# Altium PCB elc.pcb.PcbDoc
Units mm, origin at the board's own origin, x right, y up, seen from the top; angles counter-clockwise.
Board outline 40 x 50 mm, 2 copper layers (Top Layer, Bottom Layer); 16 components, 13 nets, 51 pads, 0 vias.
Unrouted connection lines stored in the file: 5.
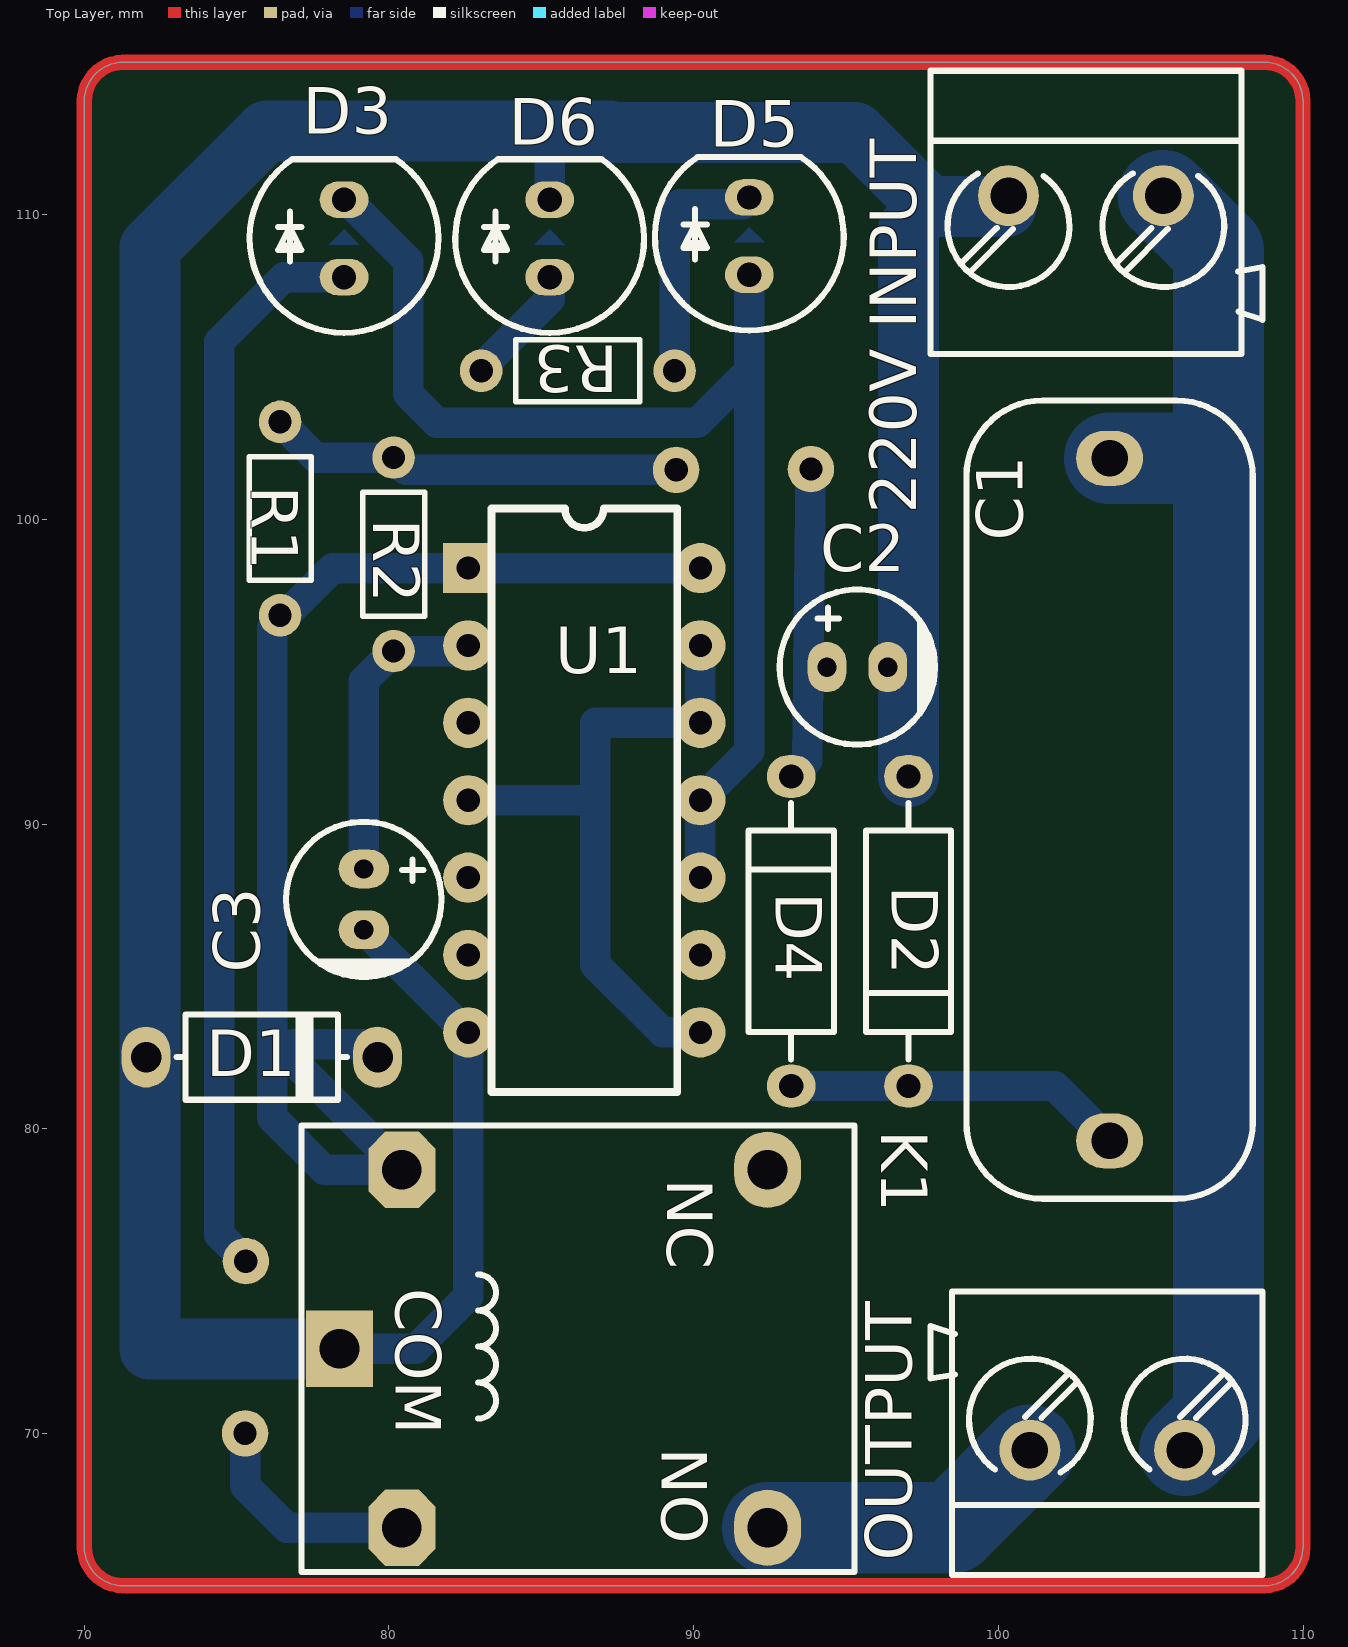
[diagram p0: Top Layer view]
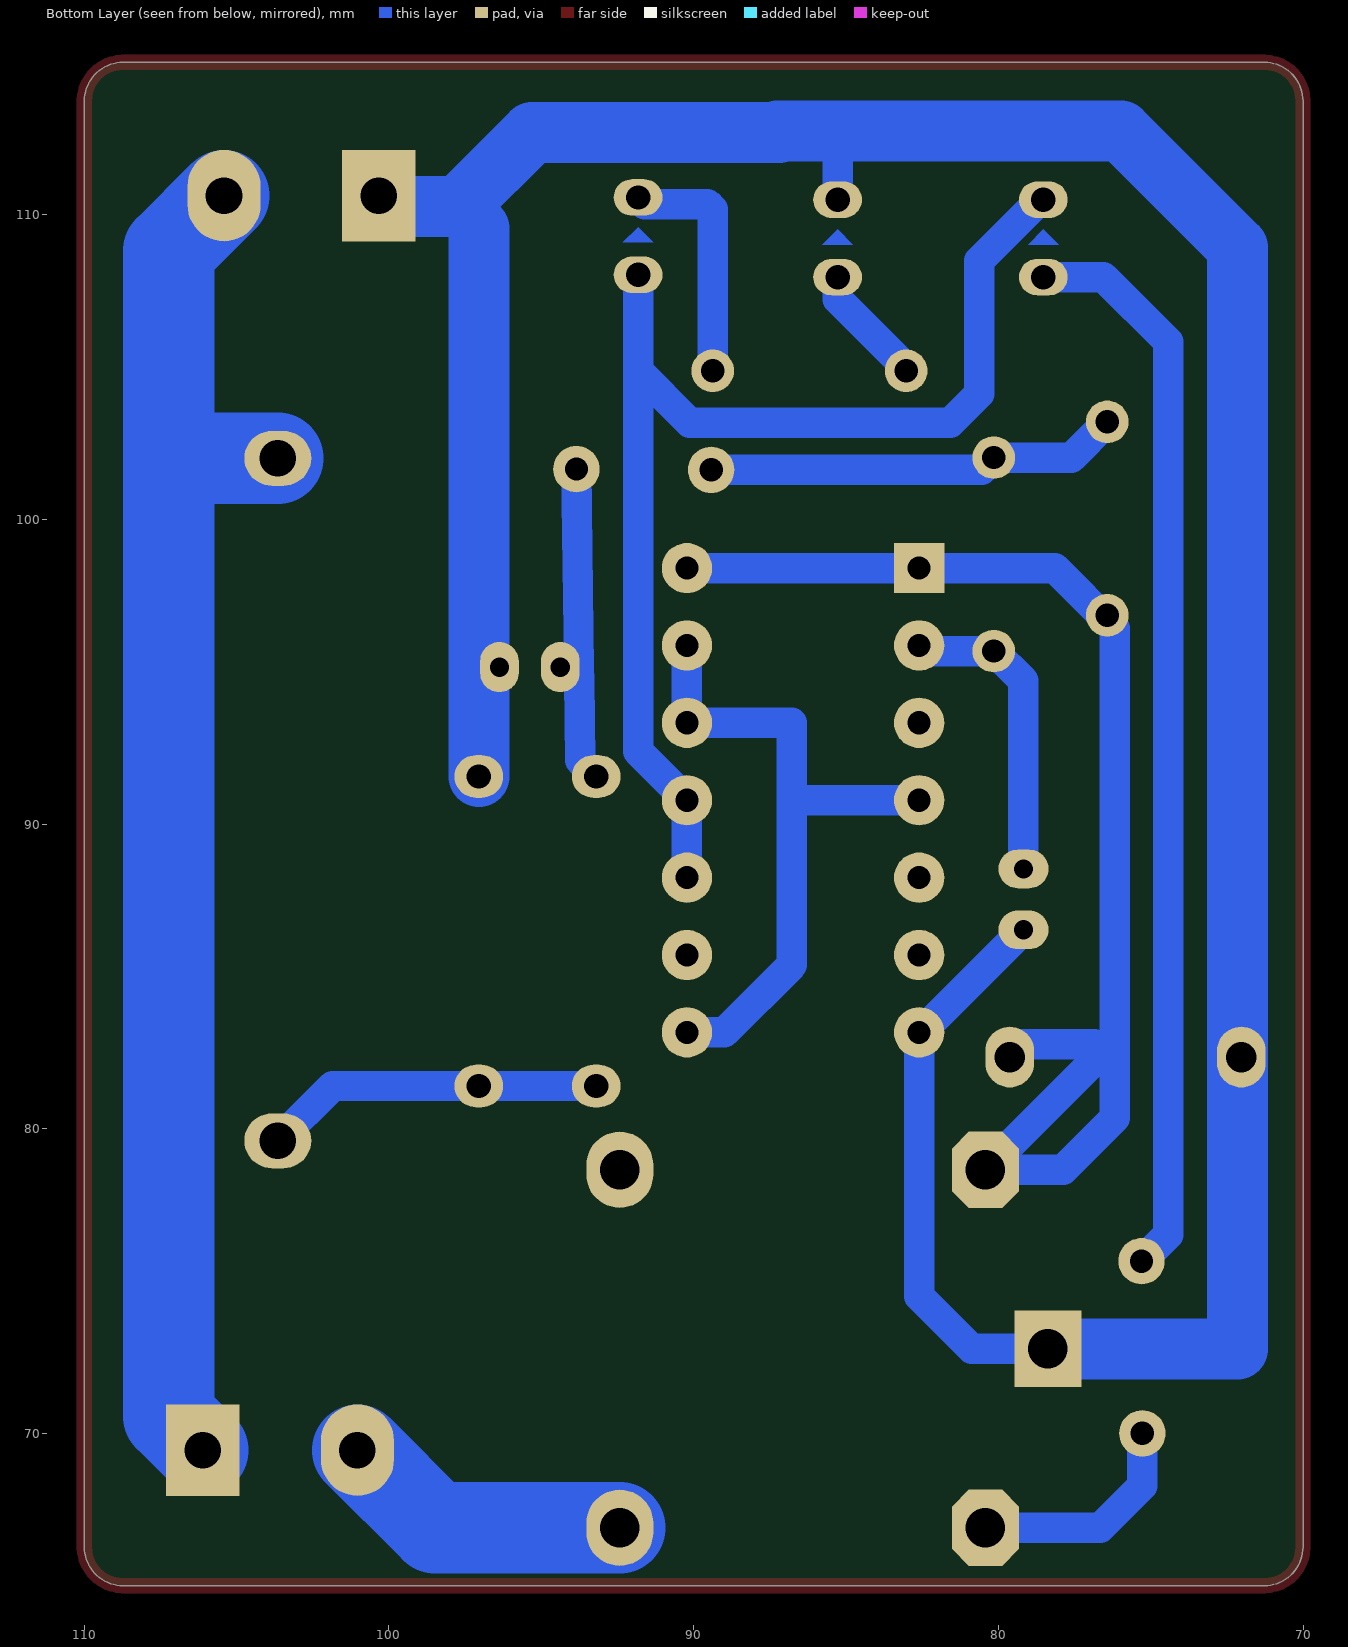
[diagram p1: Bottom Layer view, seen from below]
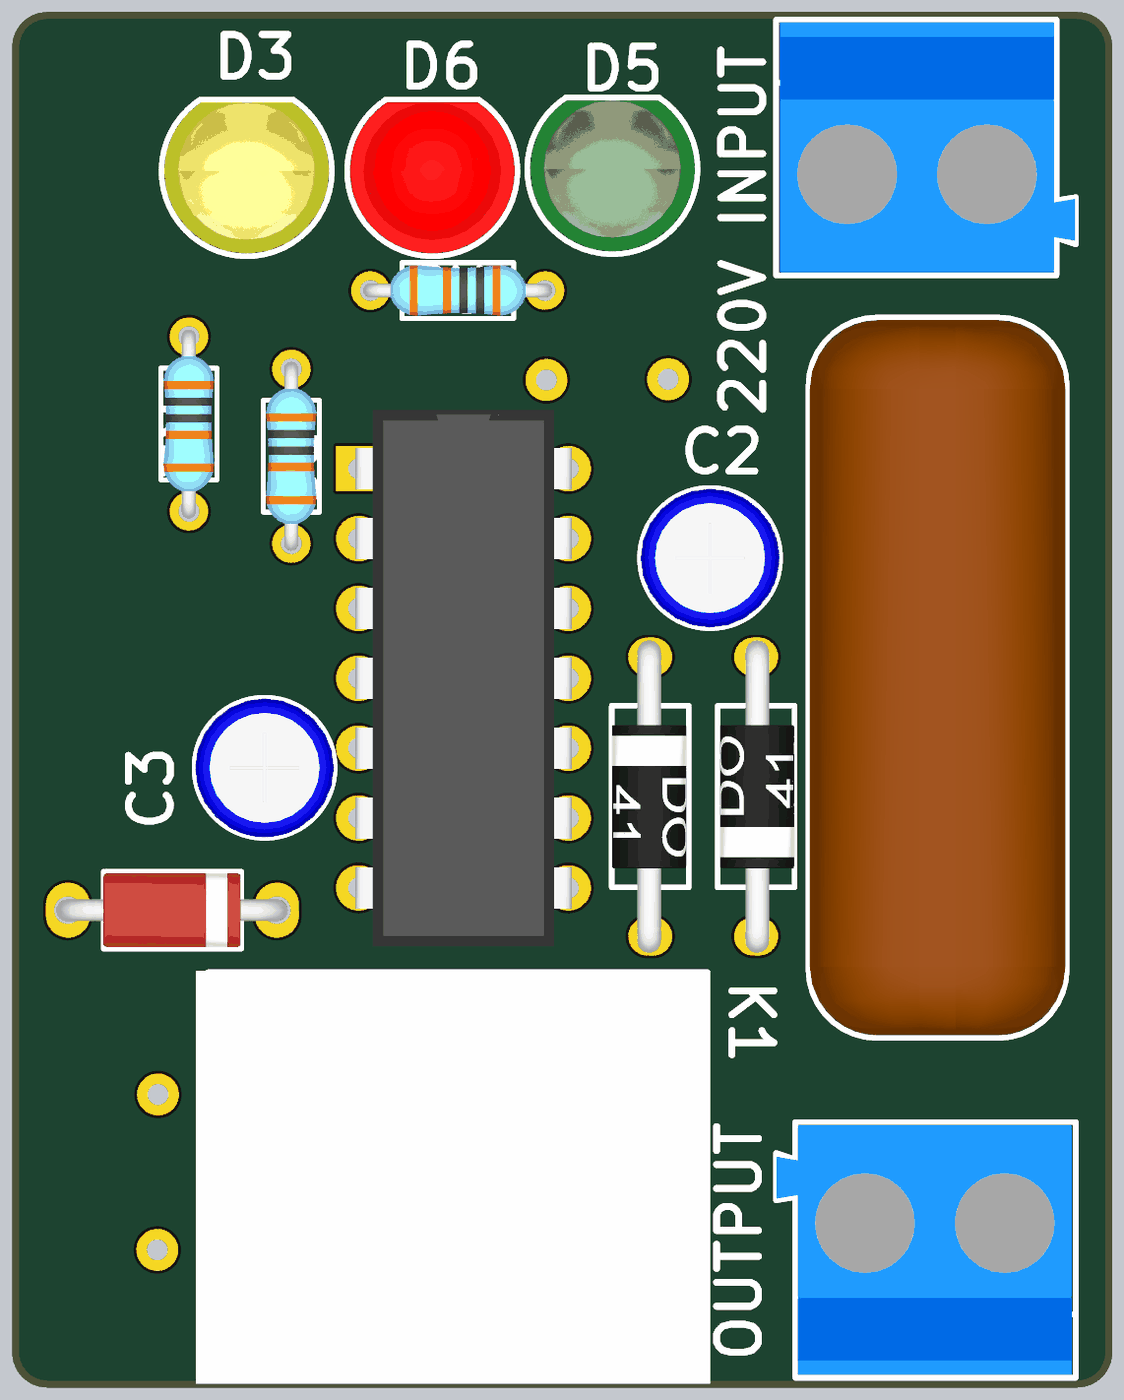
[diagram p2: 3D render of the assembled board from above, using the file's embedded part models]

## Layer stack, top to bottom
Top Solder: solder mask 0.0102, Solder Resist, Dk 3.5
Top Layer: signal copper 0.0356
Dielectric 1: dielectric 0.32, FR-4, Dk 4.8
Bottom Layer: signal copper 0.0356
Bottom Solder: solder mask 0.0102, Solder Resist, Dk 3.5

## Board outline
70,66.27 ccw(c71.27,66.27) 71.27,65 108.73,65 ccw(c108.73,66.27) 110,66.27 110,113.73 ccw(c108.73,113.73) 108.73,115 71.27,115 ccw(c71.27,113.73) 70,113.73

## Design rules (kind name [scope] priority, off if disabled: settings)
Clearance [All] p1: gap=0.254 ignorepadtopadclearanceinfootprint=FALSE except(0: Arc-Hole Track-Hole SMDPad-Hole THPad-Hole Via-Hole Fill-Hole Poly-Hole Region-Hole Text-Hole)
PolygonConnect [All] p1: connectstyle=Relief reliefconductorwidth=0.254 reliefentries=4 polygonreliefangle="90 Angle" airgapwidth=0.254
RoutingVias [All] p1: holewidth=0.711 width=1.27 viastyle="Through Hole" minholewidth=0.711 minwidth=1.27 maxholewidth=0.711 maxwidth=1.27
SolderMaskExpansion [All] p1: expansion=0.102
Width [All] p1: maxlimit=3 minlimit=1 preferedwidth=2
30 further rules are at their usual default settings.

## Components (designator, comment, footprint, x,y, rotation, side; value= is the part's Value field where it differs from the comment)
"220V INPUT" "CONN_TB2" TBB_2 102.875,110.625 r0 top
C1 "680nF" C_PLY_26X9 103.65,90.8 r270 top
C2 "100uF" "cap 01" 95.375,95.15 r180 top
C3 "100uF" "cap 01" 79.175,87.525 r90 top
D1 "ZENER16V" D_AX03_1W 75.825,82.35 r0 top
D2 "1N4007" D_AX04_DO41 97.05,86.48 r270 top
D3 "LED" LED5MM_YLO 78.525,109.22 r90 top
D4 "1N4007" D_AX04_DO41 93.2,86.48 r90 top
D5 "LED" LED5MM_GRN 91.825,109.295 r90 top
D6 "LED" LED5MM_RED 85.275,109.22 r90 top
K1 "Relay" "Relay 18.85x15.35x15.70" 85.4,72.775 r270 top
OUTPUT "CONN_TB2" TBB_2 103.575,69.45 r180 top
R1 "56R" Res-(1/4) 76.425,100.025 r270 top
R2 "3M3" Res-(1/4) 80.15,98.85 r270 top
R3 "3M3" Res-(1/4) 86.2,104.875 r180 top
U1 "CD4011BE" DIP14 86.41,90.78 r0 top

## Footprints (in the part's own frame and the unit in brackets; to place one, negate y for a bottom-side part, rotate by r counter-clockwise, add the part's x,y. Pads: shape width x height; smd on the part's side, far side on the other; paste and mask are expansions set on the pad)
C_PLY_26X9 [mm] "CAP, POLYESTER, 26.0X9.3mm pitch: 20.0mm, 0.68uF 400V"
  oval 1.8x2.2 hole 1.2: 1(-11.2,0) 2(11.2,0)
  silkscreen extent -13.1,-4.7 13.1,4.7, body extent -13,-4.65 13,4.65, height 3
"cap 01" [mm]
  oval 1.27x1.651 hole 0.635: 1(1,0) 2(-1,0)
  silkscreen extent -2.55,-2.55 2.55,2.55, body extent -2.53,-2.53 2.53,2.53, height 12.54
D_AX03_1W [mm] "DIODE 0.3 INCH SPACING 1W, 1N4001"
  oval 1.6x2 hole 1: 1(-3.8,0) 2(3.8,0)
  silkscreen extent -2.8,-1.4 2.8,1.4, body extent -4.22,-1.33 4.19,1.33, height 3.03
D_AX04_DO41 [mm] "DIODE 0.4 INCH SPACING DO-41"
  oval 1.4x1.6 hole 0.8: 1(-5.08,0) 2(5.08,0)
  silkscreen extent -4.2,-1.4 4.2,1.4, body extent -5.68,-1.32 5.68,1.4, height 2.85
DIP14 [mil]
  rect 65x65 hole 30: 1(-150,300)
  round 65 hole 30: 2(-150,200) 3(-150,100) 4(-150,0) 5(-150,-100) 6(-150,-200) 7(-150,-300) 8(150,-300) 9(150,-200) 10(150,-100) 11(150,0) 12(150,100) 13(150,200) 14(150,300)
  silkscreen extent -120,-377 120,377, body extent -155,-384 155,384, height 200
LED5MM_GRN [mm] "LED THD 5MM GREEN"
  oval 1.2x1.6 hole 0.8: 1(-1.27,0) 2(1.27,0)
  Bottom Layer region: -0.2,0.5 -0.2,-0.5 0.3,0
  silkscreen extent -3.1,-3.1 2.6,3.1, body extent -3,-3 2.5,3, height 9.14
LED5MM_RED [mm] "LED THD 5MM RED"
  oval 1.2x1.6 hole 0.8: 1(-1.27,0) 2(1.27,0)
  Bottom Layer region: -0.2,0.5 -0.2,-0.5 0.3,0
  silkscreen extent -3.1,-3.1 2.6,3.1, body extent -3,-3 2.5,3, height 9.14
LED5MM_YLO [mm] "LED THD 5MM YELLOW"
  oval 1.2x1.6 hole 0.8: 1(-1.27,0) 2(1.27,0)
  Bottom Layer region: -0.2,0.5 -0.2,-0.5 0.3,0
  silkscreen extent -3.1,-3.1 2.6,3.1, body extent -3,-3 2.5,3, height 9.14
"Relay 18.85x15.35x15.70" [mm]
  rect 2.5x2.2 hole 1.3: 1(0,-7.025)
  oval 2.5x2.2 hole 1.3: 2(-5.875,7.025) 3(5.875,7.025)
  oct 2.5x2.2 hole 1.3: 4(-5.875,-4.975) 5(5.875,-4.975)
  silkscreen extent -7.32,-8.27 7.32,9.87, body extent -7.37,-8.71 7.63,9.98, height 15.7
Res-(1/4) [mil]
  round 55 hole 30: 1(-125,0) 2(125,0)
  silkscreen extent -80,-40 80,40, body extent -135,-36 135,36, height 115
TBB_2 [mm] "Terminal Block Blue"
  round 2 / inner round 2 / far side rect 2.4x3 hole 1.2: 1(-2.54,0)
  round 2 / inner round 2 / far side oval 2.4x3 hole 1.2: 2(2.54,0)
  silkscreen extent -5.1,-5.2 5.8,4.1, body extent -4.96,-5.08 5.78,3.99, height 12.52

## Part data
"220V INPUT" OUTPUT: "CONN, TERMINAL BLOCK, 5.08mm pitch", =http://www.chila.ir
C1: library part CAP_THD_FILM_POLYESTER, "CAP, FILM,", =http://www.chila.ir, ASSEMBLY=ASSEMBLY, DESC="CAP, FILM,", MANF=MANF, MANF_P#=MANF_PART#, PARAM=400V, PARAM2=PARAM2, Price="100= 1$"
C2 C3: library part Cap-Polar, "Polar Capacitor", Voltage=16V, Adding Date=1387/12/20, Designer="Saeid Jorablo", Organazation=ControTec
D1: library part DIODE_THD_ZENER_1W, "DIODE, ZENER, 1W", =http://www.chila.ir, ASSEMBLY=ASSEMBLY, DESC=DESCRIPTION, MANF=Diodes, MANF_P#=ZENER15V, PARAM=15V, PARAM2=0.2W, Price=PRICE
D2 D4: library part DIODE_THD_1N4007, "DIODE, GENERAL PURPOSE, 1000V/1A", =http://www.chila.ir, ASSEMBLY=ASSEMBLY, DESC=DESCRIPTION, MANF=Diodes, MANF_P#=1N4007, PARAM="1000V, 1.15V", PARAM2=1.5A, Price=PRICE
D3: library part LED_THD_5MM_YLW, "LED, THD, 5MM, YELLOW"
D5: library part LED_THD_5MM_GRN, "LED, THD, 5MM, GREEN"
D6: library part LED_THD_5MM_RED, "LED, THD, 5MM, RED"
K1: "SPDT Relay", Company=E.P.I.L, Design_Date=2011/10/31, Designer="Eng. Saeid Jorablo"
R1 R2 R3: library part Resistor, "Resistor", Power="1/8 W", Tolerance=5%
U1: "NAND Gate IC 4 Channel 14-PDIP", Package="DIP-14 Hynix", Availability=Unavailable, MF="Texas Instruments", MP=CD4011BE, Price=None, SnapEDA_Link=https://www.snapeda.com/parts/CD4011BE/Texas%20Instruments/view-part/779791/?ref=snap

## Free pads (board coordinates)
  round 1.524 hole 0.762: 2(75.3,75.65) 3(75.275,70) 4(93.85,101.65) 5(89.425,101.625)

## Nets (pads, with @x,y where several pads share a name; then routed paths per layer and width w, separated by ;. In a path a pad name is that pad's centre, name@x,y a point inside that pad or via, vN(x,y) a via of type N, cw(c..) or ccw(c..) an arc to the next point about the centre after c; other vN are vias at no path point)
"Net220V INPUT_1": "220V INPUT.1" C2.2 C3.2 D1.1 D2.1 D6.2 K1.1 U1.7 | length 113.7
  Bottom Layer w1: K1.1 80.875,72.775 82.6,74.5 U1.7 82.54,83.16 C3.2 ; D6.2 85.275,112.525 85.1,112.7 87.2,112.7 87.25,112.75
  Bottom Layer w2: K1.1 72.15,72.775 72.15,108.925 75.975,112.75 87.25,112.75 ; 87.2,112.7 95.3,112.7 97.75,110.25 ; D2.1 97.05,109.55 ; 98.05,110.275 100.26,110.275
"Net220V INPUT_2": "220V INPUT.2" C1.1 OUTPUT.1 | length 46.1
  Bottom Layer w3: C1.1 106.95,102 107.225,102.275 ; 105.415,110.625 107.225,108.815 107.225,102.275 ; OUTPUT.1 107.225,70.56 107.225,102.275
NetC1_2: C1.2 D2.2 D4.1 | length 11.2
  Bottom Layer w1: D4.1 D2.2 101.85,81.4 C1.2
NetC2_1: C2.1 D4.2 pad.4 pad.5 R1.1 R2.1 | length 24
  Bottom Layer w1: R1.1 77.6,102.025 R2.1 80.55,101.625 pad.5 ; D4.2 93.725,92.085 93.76,94.731 93.765,95.158 93.78,96.331 pad.4
NetC3_1: C3.1 R2.2 U1.2 | length 10.1
  Bottom Layer w1: C3.1 79.175,94.7 R2.2 82.415,95.675 U1.2
NetD1_2: D1.2 K1.4 R1.2 U1.1 U1.14 | length 44.4
  Bottom Layer w1: D1.2 79.2,82.775 76.85,82.775 76.85,82.225 K1.4 77.875,78.65 76.175,80.35 76.175,96.425 78.15,98.4 U1.1 U1.14
NetD3_1: D3.1 K1.5 pad.2 pad.3 | length 43
  Bottom Layer w1: pad.3 75.275,68.275 76.65,66.9 K1.5 ; pad.2 74.425,76.525 74.425,105.825 76.55,107.95 D3.1
NetD3_2: D3.2 D5.1 U1.10 U1.11 | length 40
  Bottom Layer w1: D3.2 78.621,110.49 80.625,108.486 80.625,104.125 81.575,103.175 90.125,103.175 91.825,104.875 ; U1.10 U1.11 91.825,92.385 91.825,104.875 ; D5.1 91.825,104.875
NetD5_2: D5.2 R3.1 | length 7.8
  Bottom Layer w1: R3.1@89.375,104.975 89.375,110.175 89.549,110.349 91.609,110.349 D5.2
NetD6_1: D6.1 R3.2 | length 3.9
  Bottom Layer w1: R3.2@83.025,104.975 85.275,107.225 D6.1
NetK1_3: K1.3 OUTPUT.2 | length 9.7
  Bottom Layer w3: K1.3 98.485,66.9 OUTPUT.2
NetU1_3: U1.3 U1.5 U1.6
NetU1_4: U1.4 U1.8 U1.9 U1.12 U1.13 | length 22.5
  Bottom Layer w1: U1.4 86.775,90.78 ; U1.8 88.99,83.16 86.775,85.375 86.775,90.78 ; U1.13 U1.12 86.775,93.32 86.775,90.78
pads on no net: K1.2
copper on no net: | length 177.8
  Top Layer w0.5: 70,66.27 ccw(c71.27,66.27) 71.27,65 108.73,65 ccw(c108.73,66.27) 110,66.27 110,113.73 ccw(c108.73,113.73) 108.73,115 90,115 71.27,115 ccw(c71.27,113.73) 70,113.73 70,66.27

## Text inside footprints (layer, text, board x,y; h text height)
K1: Top Overlay "NC" at 89.134,78.363 h1.5 r270; Top Overlay "NO" at 88.956,69.524 h1.5 r270; Top Overlay "COM" at 80.218,74.756 h1.5 r270